# Altium PCB PCB1.PcbDoc (part 2 of 2)
Units mil, origin at the board's own origin, x right, y up, seen from the top; angles counter-clockwise.
Board outline 6000 x 4000 mil, 2 copper layers (Top Layer, Bottom Layer); 250 components, 133 nets, 708 pads, 265 vias.
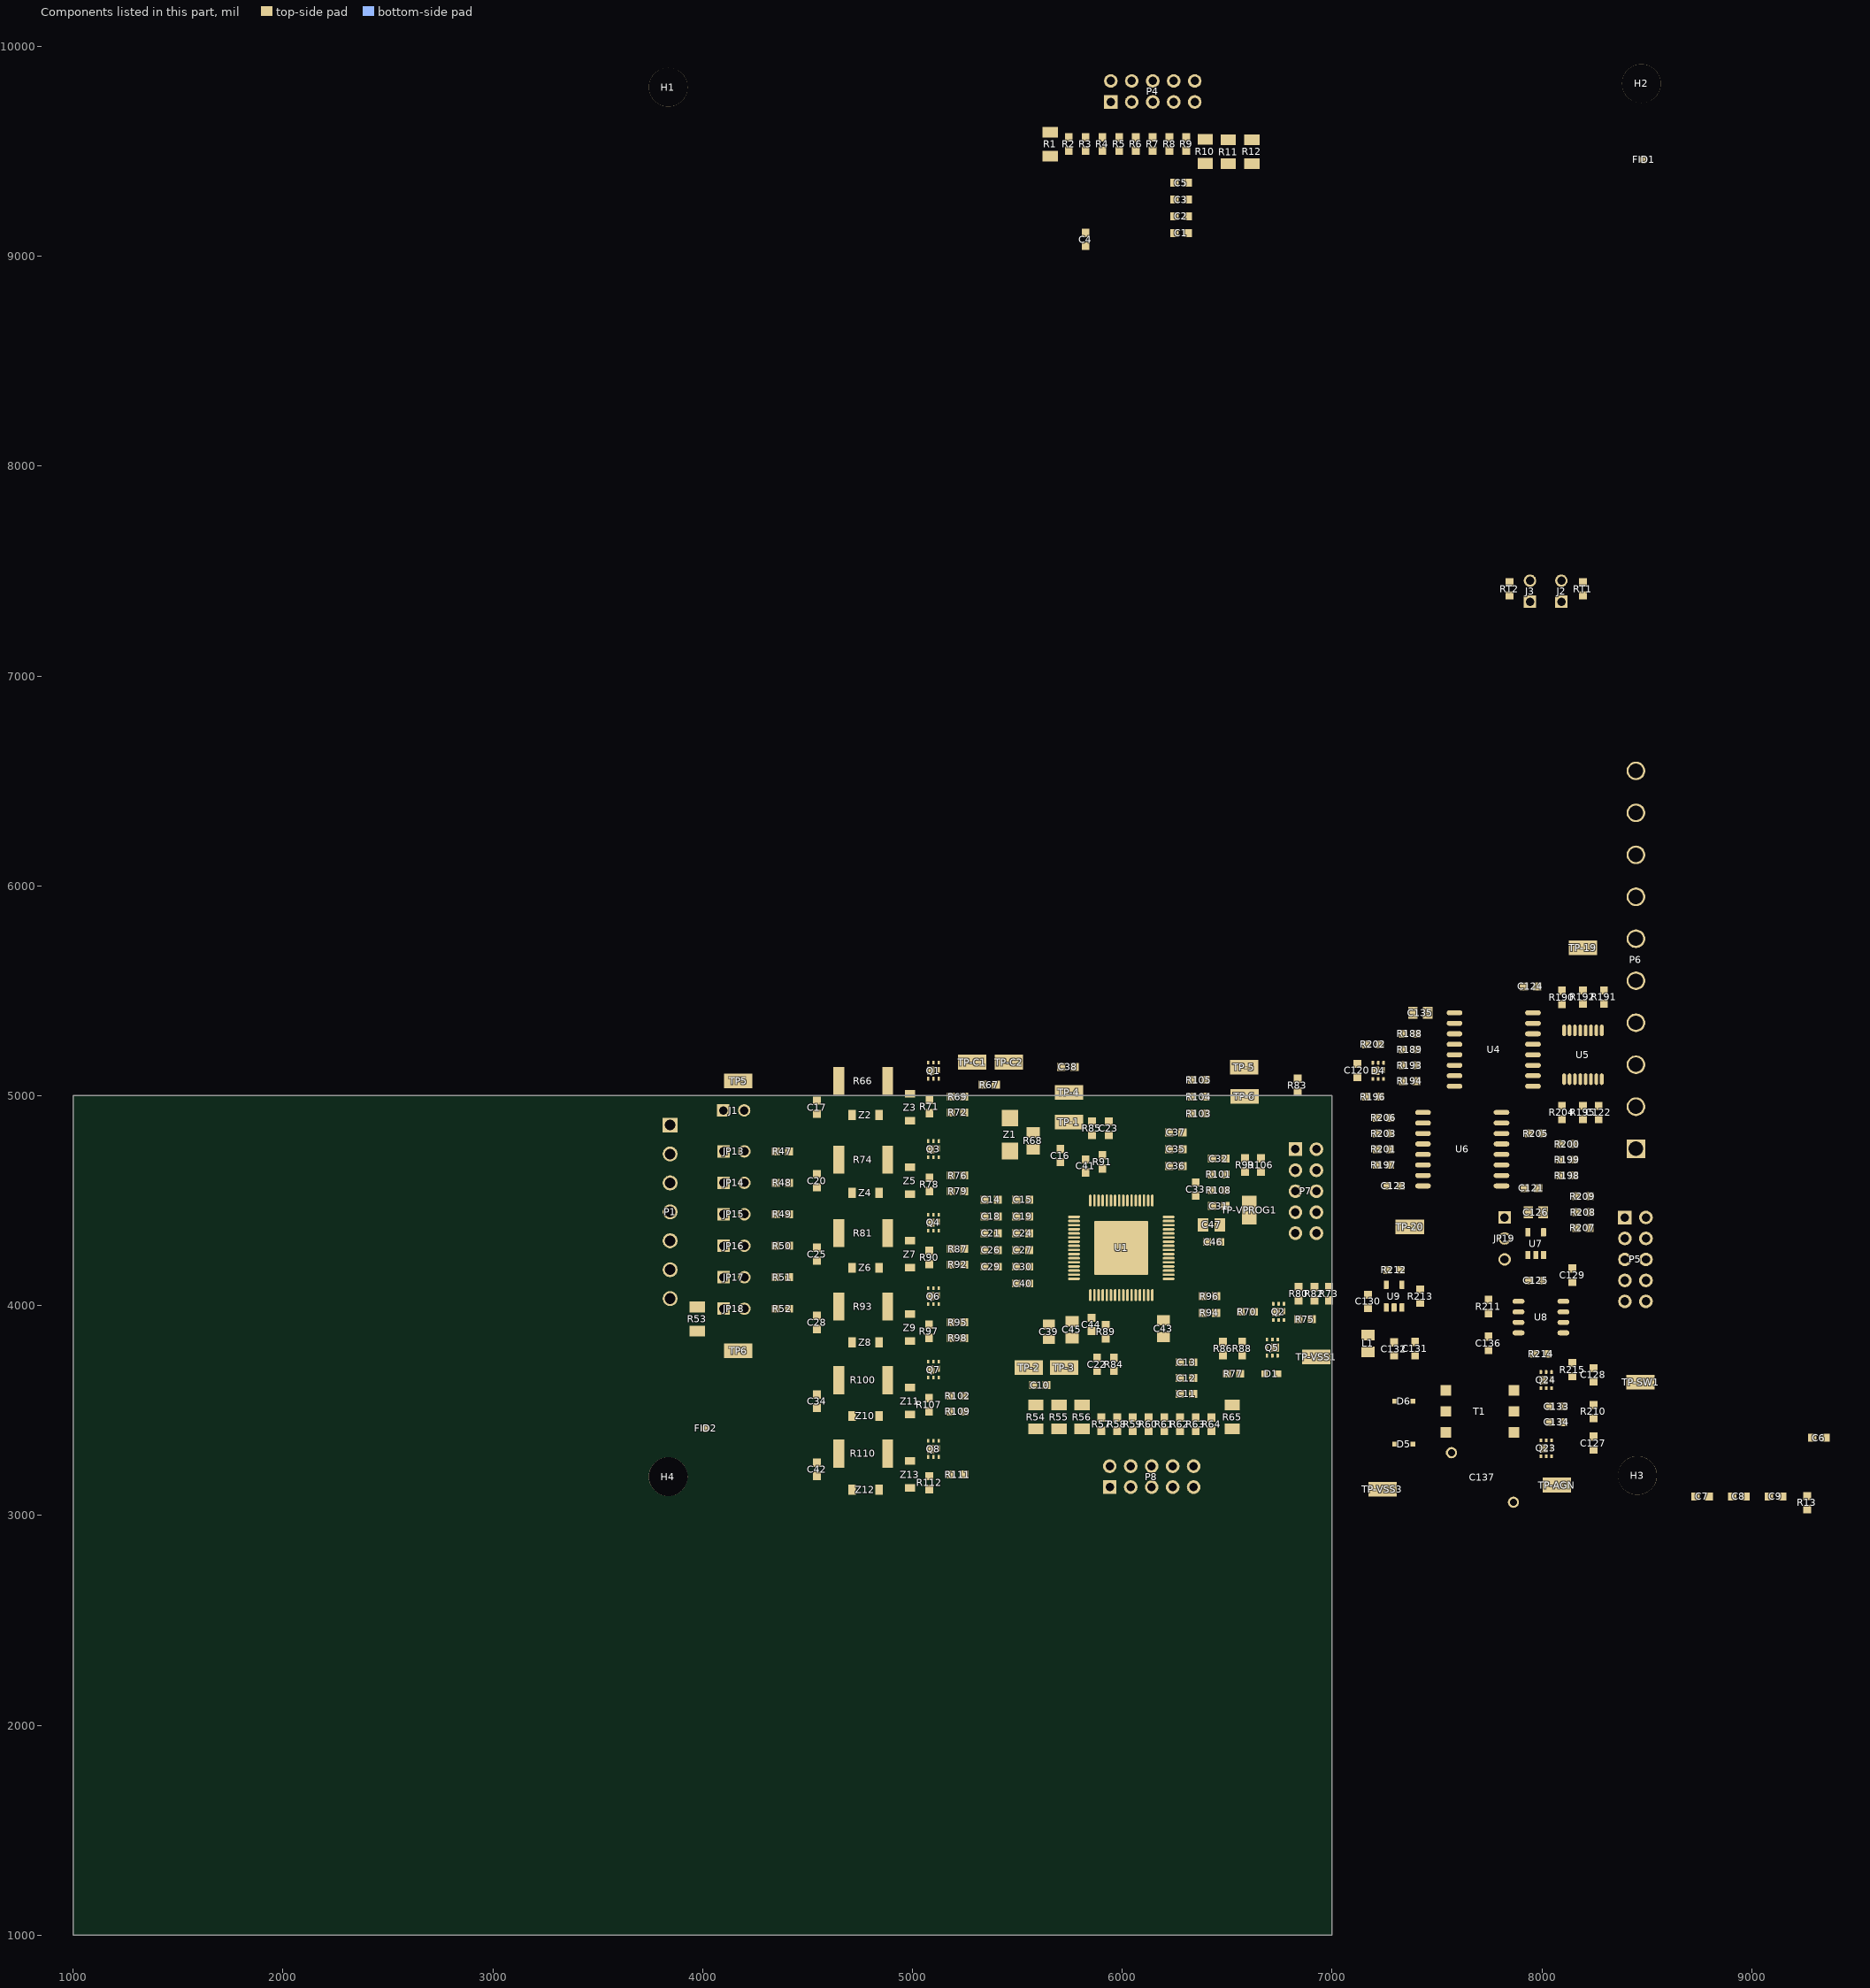
[diagram p2: the components of this part, seen from the top]

## Via types
v1: diameter 24, hole 12, Top Layer to Bottom Layer, tented both sides, 240 vias
v2: diameter 19.68, hole 7.87, Top Layer to Bottom Layer, 25 vias

## Nets (pads, with @x,y where several pads share a name; then routed paths per layer and width w, separated by ;. In a path a pad name is that pad's centre, name@x,y a point inside that pad or via, vN(x,y) a via of type N, cw(c..) or ccw(c..) an arc to the next point about the centre after c; other vN are vias at no path point) (continued)
copper on no net: | length 129699.8
  Top Layer w8: 5246.5,3195 5246.72,3195.22 v1(5317.75,3195.22) ; 5246.5,3495 5285,3495 5397.42,3607.42 5397.42,4027.82 5431.08,4061.48 5544.48,4061.48 5556.5,4073.5 5556.5,4105 5557.45,4105 5597,4144.55 5597,4185 ; 5246.5,3570 v1@5309.93,3570 ; 5246.5,3920 5247.33,3920.83 v1(5299.07,3920.83) ; 5246.5,4270 5251.96,4275.46 v1(5251.96,4333.97) ; 5246.5,4620 v1@5293.93,4620 ; 5246.5,4995 5248.53,4992.97 v1(5307.96,4992.97) ; 5250,3845 5318.26,3845 5353.43,3880.17 5353.43,4011.24 5278.31,4086.35 5278.31,4194.94 5308.2,4224.83 5452.29,4224.83 5583.06,4224.83 5597.12,4238.89 5597.12,4265.33 ; 5250,4195 5250,4201 5280,4231 5280,4279.94 5305.32,4305.26 5450.89,4305.26 5587.28,4305.26 5597.12,4315.1 5597.12,4344.35 ; 5250,4545 5250,4438.57 5291.13,4397.45 5303.17,4385.41 5586.44,4385.41 5598.53,4397.5 5598.53,4423.94 ; 5250,4920 5300.83,4920 5343.46,4877.36 5343.46,4585.46 5278,4519.99 5278,4491.01 5297.1,4471.89 5303.99,4465 5451,4465 ; 5410,4185 5451.73,4185 ; 5410,4265 5449.48,4265 ; 5410,4345 5449.76,4345 ; 5410,4425 5450.32,4425 ; 5449.48,4303.86 5449.48,4265 ; 5449.76,4384.29 5449.76,4345 ; 5450.32,4463.59 5450.32,4425 ; 5450.83,4570.17 5664.05,4570.17 5706,4528.22 5706,4446 5729.36,4422.64 5769.61,4422.64 ; 5451.45,4464.72 5587.28,4464.72 5594.59,4472.03 5594.59,4504.65 ; 5451.73,4224.27 5451.73,4185 ; 5490,4185 5451.73,4185 ; 5490,4265 5449.48,4265 ; 5490,4345 5449.76,4345 ; 5490,4425 5450.32,4425 ; v1(5535.07,3621.39) 5571,3621.39 5571,3621 ; 5555,3705 5587,3705 5637,3655 5670,3655 5706,3619 5893.48,3619 5925.7,3651.22 5925.7,3801.2 ; 5556.5,4185 5597,4185 ; 5560,4265.33 5597.12,4265.33 ; 5560,4344.35 5597.12,4344.35 ; 5560,4423.94 5598.53,4423.94 ; 5560,4504.65 5594.59,4504.65 ; v1(5586,3573) 5586,3529.57 5588,3527.57 ; 5588,3413.4 5588,3342 5695,3235 5940,3235 ; 5600,3706 5604,3706 ; v1@5624,4233 5643,4233 5655.47,4245.47 5769.61,4245.47 ; v1@5632,4303 5643,4303 5661.16,4284.84 5769.61,4284.84 ; v1@5633,4372.31 5681.1,4324.21 5769.61,4324.21 ; v1(5632.96,4441.97) 5711.42,4363.58 5769.61,4363.58 ; 5638.5,3621 5644,3621 5666,3599 5851,3599 5869,3581 5869,3530 5884,3515 5900,3515 ; v1@5667,4188 5681,4188 5699.1,4206.1 5769.61,4206.1 ; 5673.96,4265.33 5597.12,4265.33 ; 5674.13,4265.16 5766.65,4265.16 ; v1@5677.65,4510.22 5677.65,4448.35 5723.05,4402.95 5769.61,4402.95 ; 5698,3412.4 5700,3410.4 v1(5700,3357) ; 5698,3526.57 5700,3528.57 v1(5700,3573) ; 5711,4112 5726.36,4127.36 5769.61,4127.36 ; 5722,3705 5730,3705 5817,3792 5851,3792 5887,3828 5887,3900 5893.5,3906.5 5921,3906.5 5921,3936 5886.73,3970.27 5886.73,4049.61 ; 5745,5015 5842,5015 5900,4957 5900,4769 ; 5750,4880 5750,4920 5770,4940 v1(5800,4940) ; 5766.65,4343.9 5697.1,4343.9 5617.06,4423.94 5598.53,4423.94 ; 5766.65,4383.27 5719.73,4383.27 5661,4442 5661,4458.87 5615.22,4504.65 5594.59,4504.65 ; 5769.61,4147.05 5716.95,4147.05 v1(5711,4153) 5724.73,4166.73 5769.61,4166.73 ; 5769.61,4225.79 5659.95,4225.79 5619.17,4185 5597,4185 ; 5769.61,4304.53 5667.96,4304.53 5628.13,4344.35 5597.12,4344.35 ; 5775.67,5136.06 5775.67,5137.55 ; 5808,3412.4 5808,3353 5863,3298 5948,3298 5993,3253 5993,3182 6040,3135 ; 5808,3526.57 5809,3527.57 v1(5809,3573) ; v1@5847.36,3996.21 5847.36,4046.65 ; 5847.36,4503.35 5846.91,4503.8 v1(5846.91,4559.12) 5867.05,4538.98 5867.05,4503.35 ; 5855,4813.5 5855,4780.06 5866.06,4769 5900,4769 ; v1(5867,4102) v1(5867,4102) 5867.05,4049.61 ; 5878.4,4768.94 5878.4,4749.6 5868.25,4739.46 5868.25,4599.21 5906.42,4561.05 5906.42,4500.39 ; v1(5879.61,3649.07) 5879.61,3688.11 5880,3688.5 ; 5880,3755 5880,3787.92 5893.28,3801.2 5925.7,3801.2 ; v1(5899.61,3365.07) 5899.61,3401 ; 5900,3470 5900,3515 ; 5905,4653.5 5914,4644.5 v1(5914,4602) 5914,4576 5926.1,4563.9 5926.1,4500.39 ; 5905,4716.5 5900,4721.5 5900,4769 ; 5906.42,4049.61 5906.42,3981.58 5964,3924 5964,3886.5 5921,3843.5 ; 5915,5100 5915,5006.16 5968,4953.16 5968,4700.62 5945.79,4678.41 5945.79,4503.35 ; 5925.7,3840 5925.7,3801.2 ; 5926.1,4046.65 5926.1,3992.99 5999,3920.1 5999,3614 5950,3565 5920,3565 5900,3545 5900,3515 ; v1(5934,4916) 5934,4879.5 5936,4877.5 5935,4876.5 ; 5935,4813.5 5935,4780 5924,4769 5900,4769 ; 5945.79,4046.65 5945.79,4005.44 6019,3932.23 6019,3549 v1(5975,3505) 5975,3470 ; 5960,3688.5 5962,3686.5 v1(5962,3646) ; 5961.29,3755 5961.29,3792.72 5952.81,3801.2 5925.7,3801.2 ; 5965.47,4046.65 5965.47,4010.22 6050,3925.69 v1(6050,3505) 6050,3470 ; v1(5974.61,3365.07) 5974.61,3401 ; 5985.16,4046.65 5985.16,4015 6066.61,3933.55 6066.61,3563.39 v1(6125,3505) 6125,3470 ; 6024.53,4046.65 6024.53,4001.34 6095,3930.86 6095,3610 v1(6200,3505) ; 6024.53,4503.35 6024.53,4561.62 6058.13,4595.22 v1(6058.13,4920.03) 6058.13,5026.18 6045,5039.31 6045,5100 ; 6040,3235 6040,3245 5935,3350 5935,3492 5912,3515 5900,3515 ; 6044.21,4046.65 6044.21,4007.36 6115,3936.57 6115,3626.5 6236.5,3505 v1(6275,3505) 6275,3470 ; v1(6051.61,3364.07) 6051.61,3400 ; 6063.9,4046.65 6063.9,4012.37 6134.82,3941.45 6134.82,3689.02 6168.84,3655 ; 6063.9,4503.35 6063.9,4540.92 6119.12,4596.14 v1(6119.12,4997.02) 6119.12,5046.57 6120,5047.45 6120,5100 ; 6083.58,4046.65 6083.58,4015.36 6152,3946.94 6152,3762 6184,3730 6270,3730 6270,3702 6281.31,3690.69 6380.74,3690.69 6425.58,3645.85 6425.58,3575 6425,3574.42 v1(6425,3505) ; 6083.58,4503.35 6083.58,4536 6155.12,4607.54 6155.12,4961.02 6195,5000.91 6195,5100 6252.5,5100 6277.5,5075 6330,5075 ; 6122.95,4500.39 6122.95,4540.95 6133,4551 v1(6158,4551) 6142.64,4535.64 6142.64,4500.39 ; v1(6125.61,3364.07) 6125.61,3400 ; 6142.64,4049.61 6142.77,4049.47 v1@6142.77,4004.77 ; 6196,3930 6257.5,3930 6427.5,3760 6480,3760 ; v1(6199.61,3364.07) 6199.61,3400 ; 6200,3470 v1(6200,3505) ; v1(6214.42,4567.72) 6243.46,4567.72 6290,4614.26 6290,4665 6318.68,4665 6338.45,4684.78 6338.45,4744.78 6338,4745.23 ; v1(6219.05,3579.02) 6270,3579.02 6270,3580 ; 6220,4664.32 6220,4665 ; 6220,4744.78 6220,4745 ; 6220,4824.32 6220,4825 ; 6220.39,4127.36 v1@6269.64,4127.36 ; 6220.39,4147.05 6268.95,4147.05 6269.64,4146.36 ; 6220.39,4166.73 6259.27,4166.73 6271,4155 v1(6271,4126) ; 6220.39,4343.9 6180.9,4343.9 6159,4322 6159,4114 6193.29,4079.71 6435.29,4079.71 6446.5,4068.5 6446.5,4045 6446.5,3965 ; 6220.39,4363.58 6173.58,4363.58 6143,4333 6143,4104 6417,3830 6476.5,3830 6480,3826.5 6507.5,3826.5 6524,3810 6524,3773 6533.5,3763.5 6571,3763.5 ; 6220.39,4383.27 6261.11,4383.27 ; 6220.39,4402.95 6254.95,4402.95 6350,4498 ; 6220.39,4422.64 6251.04,4422.64 6308.85,4480.45 6308.85,4576.85 6322,4590 6350,4590 6350,4667.9 6382.1,4700 6391.06,4700 ; 6223.35,4186.42 6270.37,4186.42 6295.79,4161 6661,4161 6746.97,4246.97 6746.97,4377.55 6762.77,4393.35 6762.77,4645.7 6825,4707.93 6825,4745 6825,4883.75 6835,4893.75 6835,5015 6950,5015 7027.18,4937.82 7230.82,4937.82 7335,5042 7335,5070 ; 6223.35,4206.1 6277.42,4206.1 6306.53,4177 6652,4177 6730.97,4255.97 6730.97,4386.82 6742.1,4397.95 6742.1,5076.43 6834.02,5168.35 6956.66,5168.35 7130.01,4995 7160,4995 ; 6223.35,4225.79 6283.9,4225.79 6316.68,4193 6643,4193 6714.97,4264.97 6714.97,4398.6 6726.1,4409.73 6726.1,5083.02 6833.08,5190 7010,5190 7130,5310 7225.36,5310 7287.76,5247.6 7287.76,5244.24 7312,5220 7335,5220 ; 6223.35,4245.47 6289.95,4245.47 6326.42,4209 6634,4209 6698.2,4273.2 6698.2,4414.71 6710.1,4426.61 6710.1,5091.38 6838.72,5220 7015,5220 7125,5330 7328,5330 7335,5323 7335,5295 ; 6223.35,4265.16 6296.01,4265.16 6336.17,4225 6625,4225 6680,4280 6680,4440.69 v1(6681.44,4442.13) ; 6223.35,4284.84 6301.17,4284.84 6345.01,4241 6611,4241 6657.19,4287.19 6657.19,4466.41 6675.42,4484.64 v1(6675.42,4521.65) ; 6223.35,4304.53 6306.93,4304.53 6346.46,4265 v1(6555.15,4265) ; 6223.35,4324.21 6189.21,4324.21 6177,4312 6177,4122 6200.79,4098.21 6529.79,4098.21 6630,3998 6630,3970 ; 6240,3135 6190,3185 6190,3295 6162.42,3322.58 6162.42,3487.42 6180,3505 v1(6200,3505) ; 6240,3235 6285,3190 6357.93,3190 6460,3292.07 6460,3500 6455,3505 v1(6425,3505) ; 6270,3655 6168.84,3655 ; v1(6275.61,3364.07) 6275.61,3400 ; v1(6288.1,4997.02) 6330,4997.02 6330,4995 ; v1(6289.1,4917.03) 6330,4917.03 6330,4915 ; 6290,4745 6290,4745.23 6338,4745.23 ; 6290,4825 6321.41,4825 6338,4808.41 6338,4745.23 ; 6340,3135 6433,3135 6524,3226 6524,3414.91 ; 6340,3235 6340,3290.78 6315,3315.78 6315,3490 6330,3505 v1(6350,3505) ; v1(6349.61,3363.07) 6349.61,3399 ; 6350,3470 v1(6350,3505) ; 6350,4523.5 6350,4498 ; 6394.31,4625 6425,4625 ; v1(6424.61,3363.07) 6424.61,3399 ; 6425,3470 v1(6425,3505) ; 6425,4700 6391.06,4700 ; 6428.5,4475 6390,4475 ; 6428.5,4550 6399,4550 6390,4541 6390,4511 ; 6480,3763.5 6480,3760 ; 6498.5,3675 6498.5,3714.5 6480,3733 6480,3760 ; 6545,5000 6610,5000 6660,4950 6660,4705 ; 6545,5135 6545,5130 6492,5077 6492,4798 6574,4716 6585,4716 6585,4705 ; 6561.5,3675 6677.52,3675 ; 6571,3826.5 6571,3864 6594,3887 6672,3887 6689.41,3869.59 6689.41,3843.31 ; 6585,4635 6536.56,4586.56 6397.05,4586.56 6389.89,4593.72 6389.89,4698.83 6391.06,4700 ; 6660,4638.5 6660,4635 6536,4511 6390,4511 ; 6770.59,3926.69 6791.69,3926.69 6800,3935 6838.5,3935 6838.5,3907.5 6851,3895 6960,3895 6985,3920 6985,4025.5 ; 6825,4545 6875,4595 6954,4595 6977.47,4618.47 6977.47,4847.47 7025,4895 7210,4895 ; 6835,5085 v1(6835,5127.48) ; v1(6839.93,3981.71) 6839.93,4020 6840,4020 ; 6840,4090 6812,4090 6764.5,4137.5 6764.5,4371.02 6786.15,4392.67 6786.15,4406.15 6825,4445 6875,4495 6950,4495 6994.97,4539.97 6994.97,4799.97 7015,4820 7210,4820 ; 6910,4090 6915,4095 6915,4150.03 6780.5,4284.53 6780.5,4363.43 6812.07,4395 6845.15,4395 6863.83,4413.68 6893.68,4413.68 6925,4445 7015,4535 7015,4725 7035,4745 7210,4745 ; v1(6914.93,3981.71) 6914.93,4020 6915,4020 ; 6980,4090 6980,4190 6825,4345 6875,4395 6963,4395 7031,4463 7031,4660 7041,4670 7210,4670 ; 7230,4995 7230,5031.16 7245.59,5046.75 7245.59,5076.69 ; 7845,7383.5 7845,7335 7868,7312 7901,7312 7943,7354 ; 7845,7435 7845,7449 7885,7489 7916,7489 7945,7460 ; 8092,7354 8132,7314 8178,7314 8195,7331 8195,7383.5 ; 8094.15,7460.85 8122.31,7489 8159,7489 8195,7453.01 8195,7435 ; 6168.84,3655 6168.84,3595.29 6220.13,3544 6311,3544 v1(6350,3505) ; 6350,4498 6373,4475 6390,4475 ; 6390,4475 6390,4511
  Top Layer w10: 5855,4876.5 v1(5855.03,4921.43) ; 6004.84,4049.61 6004.84,4103.84 v1(6005,4104) ; 7392.5,3340 7448.5,3396 7541.4,3396 ; 7392.5,3545 7443.5,3596 7541.4,3596 ; 7745,3963.5 7745,3851.5 7803.5,3851.5 7822,3870 7900,3870 ; 7900,3920 7929,3920 7963.5,3885.5 7963.5,3770 ; 8095,5437.5 8132.5,5437.5 8155,5415 8155,5302.3 ; 8195,4951.5 8195,5001 8220,5026 8248,5026 8257.3,5035.3 8257.3,5083.3
  Top Layer w12: 5400.02,5051.45 5400.02,4659.98 5450,4610 5450,4505 ; 5406.5,4505 5450,4505 ; 5470,5175 5575,5070 5575,4820 ; 5493.5,4505 5450,4505 ; 5630,5137.55 5705.67,5137.55 ; 5630,5212.93 5630,4727.34 5653.94,4703.4 5653.94,4606.69 ; 5650,3910.43 5650,4051 5711,4112 ; 6385,4385 6385,4397.23 6422.77,4435 6555,4435 6605,4485 ; v1(6523,3573) 6524,3572 6524,3526.57 ; 7215,4170 7260,4170 ; v1(7359.8,4620.2) 7359.9,4620.1 7430.4,4620.1 ; v1(7359.8,4920.2) 7359.9,4920.1 7430.4,4920.1 ; v1(7360,4870) 7360.1,4870.1 7430.4,4870.1 ; 7405,5070 7450.1,5070 7465.1,5085 7465.1,5120 7490,5144.9 7580.6,5144.9 ; 7405,5145 7435.1,5145 7485,5194.9 7580.6,5194.9 ; 7405,5220 7460.1,5220 7485,5244.9 7580.6,5244.9 ; 7405,5295 7405.1,5294.9 7580.6,5294.9 ; v1(7410,5340) 7441,5340 7455.43,5354.43 7455.43,5395 v1(7505,5395) 7505.1,5394.9 7580.6,5394.9 ; v1(7510,5045) 7510.1,5044.9 7580.6,5044.9 ; v1(7510,5095) 7510.1,5094.9 7580.6,5094.9 ; 7807.01,4820 7938.5,4820 ; 7809.4,4570.1 7874.9,4570.1 v1(7875,4570) 7915,4570 7915,4560 ; 7809.4,4620.1 7874.9,4620.1 v1(7875,4620) ; 7809.4,4670.1 7809.5,4670 7970,4670 8020,4620 8085,4620 8085,4585 8070,4570 8070,4425 8085,4410 8190,4410 8230,4370 8230,4105 8315,4020 8395,4020 ; 7809.4,4720.1 7809.5,4720 7980,4720 8015,4685 8040,4685 ; 7809.4,4770.1 7809.5,4770 7950,4770 7960,4760 8040,4760 ; 7809.4,4870.1 7879.9,4870.1 v1(7880,4870) ; 7809.4,4920.1 7879.9,4920.1 v1(7880,4920) ; 7959.6,5144.9 8040,5144.9 8059.9,5125 8059.9,5025 8060,5024.9 8060,5020 v1(8063,5019) ; 7959.6,5194.9 7959.7,5195 8035,5195 v1@8050.9,5179.1 ; 7959.6,5244.9 7959.7,5245 v1@8028.75,5245 ; 7959.6,5294.9 7959.6,5294.96 v1(8039.09,5294.96) 8099.05,5235 8159.9,5235 8179.9,5215 8179.9,5083.9 8180.5,5083.3 ; 7970,4250 7970,4210 7980,4200 v1(8005,4200) 8007,4202 8007,4250 ; 8005,4820 v1(8055,4820) 8077.62,4820 8089.62,4808 8193.77,4808 8315,4686.77 8315,4300 8395,4220 ; v1(8014.02,3970.07) 8089,3970.07 8089,3970 ; v1(8025.63,3920.58) 8089,3920.58 8089,3920 ; v1(8030.79,5242.96) v1@8028.75,5245 ; 8045.59,3276.69 8045.59,3275.93 v1(8093.21,3275.93) ; 8045.59,3601.69 8045.59,3603.93 v1(8073.21,3603.93) ; v1(8050.9,5178.59) v1@8050.9,5179.1 ; v1(8080,3690) 8080,3718.29 8071.44,3726.85 8036.6,3726.85 8030,3733.45 8030,3770 8065,3770 8105,3730 8145,3730 ; 8085,4695 8050,4695 8040,4685 ; 8085,4770 8050,4770 8040,4760 ; 8095,4955 8060,4990 8060,5019 v1(8063,5019) ; 8103.7,5083.3 8103.7,5030 8093.7,5020 8063,5020 v1(8063,5019) ; 8103.8,5302.3 8103.8,5360 v1@8116.9,5373.1 ; v1(8115,5375) v1@8116.9,5373.1 ; 8129.3,5083.3 8129.3,5140 8109.3,5160 8070,5160 v1@8050.9,5179.1 ; 8129.4,5302.3 8129.4,5360.6 v1@8116.9,5373.1 ; 8154.9,5083.3 8154.9,5180 8134.9,5200 8075,5200 8030,5245 v1@8028.75,5245 ; 8155,4620 v1(8195,4620) ; 8155,4695 v1(8195,4695) ; 8155,4770 v1(8195,4770) ; 8180.6,5302.3 8180.6,5375 8185,5379.4 8204.4,5379.4 v1(8205,5380) ; 8195,4885 8195,4855 8210,4840 8225,4840 8235,4850 8235,4990 8250,5005 v1(8285,5005) ; 8195,5438.5 8257.4,5376.1 8257.4,5302.3 8257.4,5182.86 8335,5105.26 8335,4380 8395,4320 ; 8206.1,5083.3 8206.1,5146.1 v1(8215,5155) 8230,5140 8231.7,5140 8231.7,5083.3 ; 8206.2,5302.3 8206.2,5378.8 v1(8205,5380) ; 8231.8,5302.3 8231.8,5373.2 8225,5380 v1(8205,5380) ; 8270,4955 8285,4970 v1(8285,5005) ; 8283,5083.3 8283,5007 v1(8285,5005) ; 8295,5438.5 8295,5375 8283,5363 8283,5302.3 8283,5200.04 8355.5,5127.54 8355.5,4680 8395,4640.5 8395,4420 ; 8395,4120 8292.48,4222.52 8292.48,4482.52 8255,4520 8230,4520 8230,4560.86 8250,4580.86 8250,4676.77 8194.27,4732.5 8067.5,4732.5 8040,4760 ; 8495,4120 8448.5,4073.5 8333.89,4073.5 8270,4137.39 8270,4430 8255,4445 8230,4445 8230,4475 8222.5,4482.5 8112.5,4482.5 8094,4501 8094,4545 8119,4570 8181.77,4570 8221,4609.23 8221,4630.77 8194.27,4657.5 8067.5,4657.5 8040,4685
  Top Layer w15: v1(6288.85,4053.21) 6288.85,4016.75 6340.6,3965 6383.5,3965 6383.5,3924.58 6411.62,3896.46 6489.96,3896.46 6563.5,3970 ; v1(7215,4240) 7215,4170 7215,4144 7258,4101 7258,4087
  Top Layer w16: 6261.11,4383.27 6281.56,4383.27 v1(6282,4383) 6281.56,4383.32 6281.56,4383.46 v1@6315.48,4383.46 ; v1@6321,4379.02 6316.02,4384 v1(6322,4384)
  Top Layer w20: v1(5303,4345) 5345.5,4345 ; v1(5303,4424) 5345.5,4424 ; v1(5303,4505) 5345.5,4505 ; v1(5304,4186) 5346.5,4186 ; v1(5304,4264) 5346.5,4264 ; v1(5444.52,4025) 5490.5,4025 ; v1(5447.52,4105) 5493.5,4105 ; 5465,4893.74 v1(5465,4959) v1(5465,4991) ; 5648,3837.57 5650,3839.57 ; 5705,4746.5 v1(5705,4792) ; 5825,4699.43 v1(5825,4752) ; v1(5853,3830) 5853,3878.5 ; v1@6142.77,4004.77 v1(6142.77,3994.51) 6177.49,3994.51 6196,3976 6196,3930 ; v1(6342,4044) 6382.5,4044 6383.5,4045 ; 6466.5,4303 6468.5,4305 v1(6515,4305) ; 6901.5,3935 v1(6954,3935) ; 7120,5151.5 v1(7120,5197) ; 7163.5,5245 7166,5247.5 v1(7166,5286) ; 7170,3860 7177,3860 7219.5,3902.5 ; 7171,3988.5 7171,3951 7219.5,3902.5 ; 7171,4051.5 7172,4052.5 v1(7172,4103) ; v1(7215,4570) 7263.5,4570 ; 7257.6,3990.87 7257.6,3940.6 7219.5,3902.5 ; 7276.5,4670 7432.99,4670 ; 7276.5,4745 7281,4745 7306,4720 7432.99,4720 ; 7276.5,4820 7287,4820 7337,4770 7432.99,4770 ; 7276.5,4895 7281,4895 7356,4820 7432.99,4820 ; 7295,3825.5 7296,3826.5 v1(7296,3881) ; 7326.5,4170 7396,4170 7420,4146 7420,4076.5 ; 7326.5,4570 v1(7367,4570) ; 7332,4170 7332,4099.54 7332.4,4099.13 ; 7370,4375 7367,4378 v1(7367,4570) ; 7395,3826.5 7396,3827.5 v1(7396,3881) ; 7420,4013.5 7421,4012.5 v1(7421,3960) ; 7432.99,4570 v1(7367,4570) ; v1(7742,3738) 7742,3785.5 7745,3788.5 ; 7822,4420 7876,4420 ; v1(7864,5521) 7913.5,5521 ; v1(7889,4117) 7936.5,4117 7938.5,4119 ; 7932.6,4349.13 7895.87,4349.13 7876,4369 7876,4420 ; 7934.57,4445 7909.57,4420 7876,4420 ; 7981.5,4560 v1(8032,4560) ; 8005.43,4445 8006,4445.57 v1(8006,4496) ; 8095,4888.5 8099,4884.5 v1(8099,4837) ; 8101.5,3445 v1(8146,3445) ; 8101.5,3520 v1(8149,3520) ; v1(8119,4443) 8162.5,4443 8164.5,4445 ; v1(8120,4368) 8161.5,4368 8163.5,4370 ; v1(8120,4519) 8161.5,4519 8163.5,4521 ; 8145,3663.5 8146,3662.5 v1(8146,3618) ; 8145,4176.5 v1(8145,4227) ; 8245,3313.5 8246,3312.5 v1(8246,3260) ; 8245,3701.5 8247,3703.5 v1(8247,3747) ; 8270,4888.5 8272,4886.5 v1(8272,4834)
  Top Layer w24: 4098,4930 4098,4938 4170,5010 4170,5070 ; 4100,4930 4230.48,4799.52 4395,4799.52 4413.09,4781.43 4413.09,4735 4415,4735 ; 4101,4135 4101,4089 4120.34,4069.66 4450.63,4069.66 4471.99,4048.3 4471.99,4009.97 4446.51,3984.49 4446,3985 4415,3985 ; 4101,4285 4101,4239 4120.34,4219.66 4450.63,4219.66 4471.99,4198.3 4471.99,4159.97 4446.51,4134.49 4446,4135 4415,4135 ; 4101,4435 4101,4389 4120.34,4369.66 4450.63,4369.66 4471.99,4348.3 4471.99,4309.97 4446.51,4284.49 4446,4285 4415,4285 ; 4101,4585 4101,4539 4120.34,4519.66 4450.63,4519.66 4471.99,4498.3 4471.99,4459.97 4446.51,4434.49 4446,4435 4415,4435 ; 4101,4735 4101,4689 4120.34,4669.66 4450.63,4669.66 4471.99,4648.3 4471.99,4609.97 4446.51,4584.49 4446,4585 4415,4585 ; 4201,3985 4345,3985 ; 4201,4135 4345,4135 ; 4201,4285 4345,4285 ; 4201,4435 4345,4435 ; 4201,4585 4345,4585 ; 4201,4735 4345,4735 ; 4640,3295 4640,3205 4665,3180 4891.45,3180 4904.94,3166.51 4904.94,3137.51 4885.14,3117.71 4834.5,3117.71 4834.5,3120 ; 4640,3645 4640,3550 4655,3535 4886.45,3535 4901.21,3520.24 4901.21,3480.78 4890.43,3470 4834.5,3470 ; 4640,3995 4640,3900 4655,3885 4886.45,3885 4899.55,3871.9 4899.55,3836.55 4883,3820 4834.5,3820 ; 4640,4345 4640,4250 4655,4235 4886.45,4235 4903.28,4218.17 4903.28,4190.28 4883,4170 4834.5,4170 ; 4640,4695 4640,4605 4650,4595 4876.45,4595 4896.65,4574.8 4896.65,4550.16 4876.35,4529.86 4844.36,4529.86 ; 4640,5070 4640,4989 4667.75,4961.25 4867.57,4961.25 4893.03,4935.78 4893.03,4916.31 4881.02,4904.3 4843.8,4904.3 ; 5465,4745.5 5465,4687.33 5481.19,4671.14 5575,4671.14 ; 5575,4750 5575,4671.14 ; 5705,4680 5705,4606.69 ; 5760,3845 5760.21,3845 v1(5760.21,3785.72) ; 5760,3925 5760,3987.77 5768.44,3996.21 5847.36,3996.21 v1(5850.7,3996.21) 5850.7,3945 5850,3945 ; 5825,4630 5825,4580.32 ; v1(5846.91,4559.12) 5846.55,4558.77 5825,4580.32 ; 5854,4873 5855.03,4873 ; 5935,4872 5936.03,4872 ; v1(6197,3759) v1(6197,3802) 6197,3853 ; v1@6321,4379.02 6321,4327.22 6353.22,4295 6400,4295 ; v1(6322,4384) 6323,4385 6385,4385 ; 6331.31,3580.97 v1(6379.74,3580.97) ; 6332.31,3654.97 v1(6380.74,3654.97) ; 6333.31,3731.97 v1(6381.74,3731.97) ; 6403,5076 6403,5074.97 v1(6451.43,5074.97) ; 6404,4918.2 6404,4917.17 v1(6452.43,4917.17) ; 6405,4995 6405,4993.97 v1(6453.43,4993.97) ; 6465,4385 6465,4384.76 v1(6511.76,4384.76) v1@6511.76,4385.04 ; 6487,4552 6487,4550.97 6496.03,4560 v1(6540,4560) ; 6487,4627 6487,4625.97 v1(6535.43,4625.97) ; 6488,4477 6488,4475.97 v1(6536.43,4475.97) ; 6489,4702 6489,4700.97 v1(6537.43,4700.97) ; 7170,3775 7170,3720 7180,3710 7295,3710 ; v1(7235,3340) 7287.5,3340 ; v1(7240,3545) 7287.5,3545 ; 7295,3760 7295,3710 ; 7295,4000 7295,3955 v1(7315,3935) 7330,3950 7332,3950 7332,4000 ; v1(7330,5395) 7380,5395 ; 7395,3760 7395,3710 ; v1(7505,5345) 7505.1,5344.9 7580.6,5344.9 ; 7541.4,3496 7611,3496 7640,3525 7640,3660 7590,3710 7395,3710 ; v1(7584.3,3114.12) 7628.5,3114.12 7628.5,3174.39 7585.07,3174.39 v1(7585.07,3174.64) ; 7745,4030 7745,4233.28 7781.72,4270 7871.39,4270 7891.39,4250 7933,4250 7933,4210.23 7977.67,4165.56 8061.51,4165.56 8077.5,4149.57 8077.5,4110 8145,4110 8145,4020 ; 7820,4220 7820,4095 7840,4075 v1(8005,4075) 8005,4120 ; v1(7834.05,3969.87) 7834.05,3970 7900,3970 ; v1@7858.57,3113.35 v1(7858.57,3112.59) 7810.41,3112.59 7809.5,3113.5 7809.5,3174.6 7859.33,3174.6 v1(7859.33,3173.87) 7916.13,3173.87 7945,3145 8070,3145 ; 7959.6,5044.9 8031,5044.9 v1(8031,5044) ; 7959.6,5094.9 8030,5094.9 v1(8030,5096) ; 7959.6,5344.9 8034.9,5344.9 v1(8035,5345) ; 7959.6,5394.9 7959.6,5454.6 v1(7960,5455) 7960,5455.36 7980,5475.36 7980,5520 ; 7976.5,5521 8014,5521 8034.5,5500.5 8095,5500.5 ; 8035,3520 8035,3445 8082.78,3397.22 8164.8,3397.22 8182.02,3380 8245,3380 8245,3460 8209,3460 8190,3479 8190,3580 8245,3635 8320,3635 ; 8089,3870 8161.18,3870 v1(8161.18,3867.98) ; 8089,4020 8145,4020 ; 8095,5505 8095,5640 8125,5670 8190.55,5670 8192.47,5668.08 ; 8195,5501.5 8195,5665.55 8192.47,5668.08 ; v1(8245,3580) 8245,3530 8328.63,3530 8343.63,3545 8530,3545 8570.04,3585.04 8570.04,4220 ; 8295,5505 8295,5636.09 8227.74,5703.35 8192.47,5668.08 ; 8470,3635 8320,3635 ; 8495,4220 8570.04,4220 ; 8495,4320 8557,4320 8570.27,4306.73 8570.27,4220 8570.04,4220 ; 5575,4671.14 5575,4648.87 5617.18,4606.69 5653.94,4606.69 5705,4606.69 ; 5705,4606.69 5734,4606.69 5767.69,4573 5825,4573 5825,4580.32 ; 7295,3710 7395,3710 ; 8145,4020 8320,3845 8320,3635
  Top Layer w25: 4200,4930 4525,5255 5340,5255 5420,5175 5470,5175 ; 4640,5070 4640,5151.5 4703.5,5215 5205,5215 5260,5160 5262,5160 5333.52,5088.48 5333.52,5051.75
  Top Layer w30: 7866.6,3496 7922,3496 7973,3445 8035,3445
  Top Layer w40: 3845,4860 3850,4865 3850,5243.5
  Top Layer w48: 3845,4033.23 3895.23,3983 4101,3983 4101,3891.75 4095,3885.75 4095,3785
  Bottom Layer w8: v1@5251.55,4334.16 5289.36,4371.97 v1(5631.96,4371.97) ; v1@5294.41,4619.83 5455.1,4619.83 v1(5632.96,4441.97) ; v1(5299.07,3920.83) 5324.49,3946.25 5324.49,4015.91 5516.81,4208.24 5534.08,4208.24 v1@5627.46,4301.62 ; v1@5308.97,4993.87 5338.86,4963.98 5338.86,4849.07 v1(5675.96,4511.97) ; v1@5309.9,3570 5366,3626.1 5366,3901.02 5627.96,4162.98 v1(5627.96,4232.97) ; v1(5317.75,3195.22) 5444.55,3322.01 5444.55,3892.05 5646.53,4094.03 5646.53,4166.96 v1@5665.61,4186.04 ; v1(5700,3357) 5700,3228 5793,3135 5940,3135 ; v1(5800,4940) 5800,4905 5831,4874 5884,4874 5937,4821 5937,4625 v1(5914,4602) ; v1(5846.91,4559.12) 5992.11,4559.12 6007.99,4575 6182,4575 6189.28,4567.72 v1(6214.42,4567.72) ; v1@5854.8,4918.12 5878.8,4942.12 5973.52,4942.12 6024.64,4891 6517.79,4891 7945,6318.21 7945,7360 ; v1(5879.61,3649.07) 5879.61,3901.67 5972.45,3994.51 v1(6142.77,3994.51) 6340.51,3994.51 6404,4058 6404,4753.81 6399.53,4758.28 6399.53,4851.04 ; v1(5934,4916) 5998.96,4851.04 6399.53,4851.04 ; v1@5959.4,3648.42 6128.42,3648.42 6451,3971 6451,4778.19 8095,6422.19 8095,7360 ; v1(6058.13,4920.03) 6127.08,4920.03 6132.11,4915 6215.01,4915 6217.04,4917.03 v1(6289.1,4917.03) ; v1(6119.12,4997.02) 6141.58,4997.02 6148.6,4990 6215.01,4990 6222.03,4997.02 v1(6288.1,4997.02) ; v1(6555.15,4265) 6595,4265 6655.97,4325.97 6655.97,4450.6 6694.87,4489.5 6880.5,4489.5 6925,4445 ; v1(6675.42,4521.65) 6728.29,4521.65 6751.64,4545 6825,4545 ; v1(6681.44,4442.13) 6728.29,4442.13 6731.16,4445 6825,4445 ; 7945,7460 8004.43,7460 8022.62,7438.77 ; 8095,7460 8043.85,7460 8022.62,7438.77 ; 6399.53,4851.04 6500.46,4851.04 8022.62,6373.2 8022.62,7438.77
  Bottom Layer w12: v1(5586,3573) 5586,3577 5624,3615 5713,3615 5752,3576 5752,3514 5801,3465 5958,3465 5975,3482 v1(5975,3505) ; v1(5700,3573) 5700,3502 5777,3425 5970,3425 v1(6050,3505) ; v1(5809,3573) 5809,3574 5843,3608 6022,3608 v1(6125,3505) ; v1(6200,3505) 6219.05,3524.05 v1(6219.05,3579.02) ; v1(6275,3505) 6305,3535 6485,3535 v1(6523,3573) ; v1(7165,5095) v1(7410,5340) ; v1(8014.02,3970.07) 8180,3804.09 8180,3362.71 v1(8093.21,3275.93) ; v1(8025.63,3920.58) 8155.48,3790.73 8155.48,3686.19 v1(8073.21,3603.93) ; v1(8030.79,5242.96) 8225.43,5242.96 8323.38,5145 8445,5145 ; v1(8039.09,5294.96) 7977,5294.96 7955,5272.96 7955,5094 7979,5070 8320,5070 8445,4945 ; v1(8050.9,5178.59) 8004.79,5224.7 8004.79,5253.72 8020.02,5268.96 8179.41,5268.96 8255.45,5345 8445,5345 ; v1(8063,5019) 8216,4866 8480,4866 8515,4901 8515,5409 8445,5479 8445,5545 ; v1(8080,3360) 8021,3419 8021,3631 v1(8080,3690) ; 8395,4020 8441.5,3973.5 8514.26,3973.5 8581.5,4040.74 8581.5,6208.5 8445,6345 ; 8395,4120 8348.5,4073.5 8348.5,4000.74 8395.74,3953.5 8522.55,3953.5 8601.5,4032.45 8601.5,6388.5 8445,6545 ; 8395,4220 8445,4170 8445,4104.24 8475.74,4073.5 8514.26,4073.5 8561.5,4120.74 8561.5,6028.5 8445,6145 ; 8445,5945 8445,5860.25 8541.5,5763.75 8541.5,4166.5 8495,4120
  Bottom Layer w24: v1(5867,4102) 5867,4092.03 5905.82,4053.21 v1(6288.85,4053.21) 6322,4086.36 v1(6322,4384) ; v1(8005,4075) 8210,3870 8210,3615 v1(8245,3580)
  Bottom Layer w48: 3845,4171.02 3958.89,4171.02 3994.91,4135 4101,4135 4176,4060 4213.68,4060 4305,3968.68 4305,3603.43 4493.43,3415 v1(4550,3415) v1(4595,3415) v1(4640,3415) ; 3845,4308.82 3958.89,4308.82 3982.71,4285 4101,4285 4176,4210 4213.68,4210 4410,4013.68 4410,3843.43 4488.43,3765 v1(4545,3765) v1(4595,3765) v1(4645,3765) ; 3845,4446.61 3958.89,4446.61 3970.5,4435 4101,4435 4176,4360 4292.44,4360 4542.44,4110 v1(4565,4110) v1(4620,4110) v1(4665,4110) ; 3845,4584.41 3976.6,4584.41 3977.19,4585 4101,4585 4166,4650 4415,4650 4528,4537 4528,4482.19 4550.19,4460 v1(4565,4460) v1(4615,4460) v1(4665,4460) ; 3845,4722.2 3976.6,4722.2 3989.4,4735 4101,4735 4163,4797 4285.34,4797 4313.34,4825 v1(4575,4825) v1(4630,4825) v1(4680,4825) ; 3845,4860 4030,4860 4230,5060 v1(4525,5060) v1(4565,5060) ; 4101,3985 4101,3899.32 4215,3785.32 4215,3310 4430,3095 v1(4584,3095) v1(4625,3095) ; v1(5130,4516) 5130,4636 5170,4676 5170,4748.17 v1(5169.74,4748.17) 5170,4751 v1(5170,4791) ; v1(5130.15,3815.54) 5130,3819 5130,3982 5165,4017 5165,4048.48 v1(5164.89,4048.48) 5165,4051 v1(5165,4091) ; v1(5130.26,4880.34) 5130,4885 5130,5031 5170,5071 v1(5170,5163) ; v1(5135,3084) 5135,3214 5160,3239 v1(5160,3368) ; v1(5135,3465) 5135,3588 5165,3618 5165,3697.84 v1(5165.82,3697.84) 5165,3701 v1(5165,3741) ; v1(5135,4172) 5135,4293 5165,4323 v1(5165,4444)
  other v1: 4045,3095 4245,3095 5495,3095 5695,3095 6545,3095 6745,3095 6945,3095 4541,3096 5134.84,3127.25 6995,3245 5160.19,3324.82 5295,3345 3745,3445 6995,3445 5135.24,3512.34 5309.96,3569.97 3745,3645 5295,3695 6655,3775 3956,3786 3996,3786 5647.52,3788 3955,3827 3996,3827 3745,3845 5129,3859 5295,3995 3745,4045 6785,4045 5665.96,4185.97 5134.5,4214.45 3745,4245 5629.96,4301.97 5165.15,4400.14 3745,4445 5129.41,4559.58 5293.96,4619.97 3745,4645 5295,4795 3745,4845 5131,4926 5362,4991 4545,5025 3745,5045 6925.82,5106.15 5169.45,5119.9
  other v2: 5892.64,4172.64 5943.82,4172.64 5995,4172.64 6046.18,4172.64 6097.36,4172.64 5892.64,4223.82 5943.82,4223.82 5995,4223.82 6046.18,4223.82 6097.36,4223.82 5892.64,4275 5943.82,4275 5995,4275 6046.18,4275 6097.36,4275 5892.64,4326.18 5943.82,4326.18 5995,4326.18 6046.18,4326.18 6097.36,4326.18 5892.64,4377.36 5943.82,4377.36 5995,4377.36 6046.18,4377.36 6097.36,4377.36

## Other copper
Top Layer:
  region: 4355,5265 4328.81,5238.81 4426.19,5238.81 4400,5265
  region: 5798.15,4190.35 5798.13,4190.37 5732.43,4190.37 5703.09,4161.03 5703.09,4143.01 5797.46,4143.01 5798.15,4142.32
  region: 6750,4030 6685,4030 6645,3990 6615,3990 6615,3950 6645,3950 6685,3910 6750,3910 6750,4030
  region: 7842,3421 7842,3325 7910,3325 7975,3260 8025,3260 8025,3333 8025,3375 7983,3375 7937,3421
  region: 4510,4229 4510,3935 4680,3935 4680,4065 4625,4065 4625,4080 4985,4080 5065,4160 5202.98,4160 5202.98,4225 4985,4225 4890,4130 4730,4130 4730,4205 4590,4205 4566,4229
  region: 4508.3,3530 4508.3,3240 4675,3240 4675,3365 4635,3365 4635,3380 4980,3380 5050,3450 5202.98,3450 5202.98,3520 4980,3520 4885,3425 4745,3425 4745,3500 4605,3500 4575,3530
  region: 4508.3,3200 4508.3,3050 5205,3050 5205,3148 4964,3148 4901,3085 4792,3085 4729,3148 4642,3148 4590,3200
  region: 5115,4800 5190,4800 5190,4734 5115,4734
  region: 4964,4590 5202.98,4590 5202.98,4715 5130,4715 5115,4700 5115,4680 5105,4670 5035,4670 5025,4680 4964,4680
  region: 8025,3590 7910,3590 7891,3571 7841,3571 7841,3620 7921,3700 8025,3700
  region: 4510,4580 4510,4261 4675,4261 4675,4415 4630,4415 4630,4430 4950,4430 5025,4505 5202.08,4505 5202.08,4565 4970,4565 4885,4480 4730,4480 4730,4565 4590,4565 4575,4580
  region: 6695,3745 6630,3745 6630,3810 6695,3810 6695,3745
  region: 4508.3,3905 4508.3,3562 4680,3562 4680,3715 4625,3715 4625,3730 4980,3730 5055.25,3805.25 5203.43,3805.25 5203.43,3870.91 4985.91,3870.91 4890,3775 4735,3775 4735,3850 4618,3850 4563,3905
  region: 4925,4625 4850,4625 4850,4760 4965,4760 5010,4805 5106,4805 5106,4685 5055,4685 5030,4710 4956,4710 4925,4679
  region: 4914,5005 4850,5005 4850,5185 5106,5185 5106,5065 4955,5065 4914,5024
  region: 8040,3310 8095,3310 8095,3375 8040,3375 8040,3310
  region: 4964,3540 5203.43,3540 5203.43,3665 5130,3665 5115,3650 5115,3635 5100,3620 5055,3620 5045,3630 4964,3630
  region: 4680,5135 4511,5135 4510,5134 4510,4955 4575,4955 4620,5000 4680,5000
  region: 6710,3860 6710,3745 6720,3735 6720,3655 6765,3655 6765,3860 6710,3860
  region: 8040,3635 8095,3635 8095,3705 8040,3705 8040,3635
  region: 4854,3578 4854,3710 4985,3710 5035,3760 5106,3760 5106,3640 5060,3640 5040,3660 4965,3660 4910,3605 4910,3578
  region: 5115,3375 5185,3375 5185,3306 5115,3306
  region: 5115,4450 5185,4450 5185,4384 5115,4384
  region: 7225,5180 7185,5180 7185,5135 7165,5115 7100,5115 7100,5070 7140,5070 7155,5055 7225,5055
  region: 4510,4932 4510,4613 4680,4613 4680,4765 4625,4765 4625,4785 4948.63,4785 5023.63,4860 5203.43,4860 5203.43,4940 4975,4940 4885,4850 4730,4850 4730,4932
  region: 4964,3206 5000,3170 5203.88,3170 5203.88,3290 5125,3290 5115,3280 5115,3250 5105,3240 5055,3240 5020,3275 5020,3290 4964,3290
  region: 5115,5175 5195,5175 5195,5108 5115,5108
  region: 4964,4240 5202.98,4240 5202.98,4365 5120,4365 5120,4330 5105,4315 5060,4315 5042,4333 4964,4333
  region: 4964,3890 5203.43,3890 5203.43,4015 5130,4015 5115,4000 5115,3985 5105,3975 5055,3975 5038,3992 4964,3992
  region: 4856,3360 4856,3227 4912,3227 4933,3248 4933,3310 5030,3310 5050,3290 5050,3265 5106,3265 5106,3375 5050,3375 5035,3360
  region: 6765,3960 6805,3960 6805,4065 6765,4065 6765,3960
  region: 4855,4065 4855,3930 4913,3930 4913,3968 4970,4025 5030,4025 5060,3995 5060,3990 5106,3990 5106,4100 5030,4100 4995,4065
  region: 7215,5265 7215,5230 7235,5210 7235,5106 7261,5106 7280,5125 7350,5125 7350,5165 7305,5165 7295,5175 7295,5200 7245,5250 7245,5265
  region: 5115,4100 5185,4100 5185,4034 5115,4034
  region: 5115,3750 5185,3750 5185,3684 5115,3684
  region: 4932,4278 4855,4278 4855,4415 4970,4415 5015,4460 5106,4460 5106,4340 5060,4340 5035,4365 4970,4365 4932,4327
  region: 5203.43,4960 5203.43,5090 5120,5090 5120,5065 5095,5040 4964,5040 4964,4960
  region: 3938,3906 4012,3906 4012,3752 3938,3752

## Silkscreen, mask and mechanical layers (free items; w line width, h text height)
Top Overlay:
  lines w6: 6208,3621 6226,3603 6235,3603
  lines w8: 6670,3555 6690,3555 ; 6725,3525 6725,3555 ; 6725,3585 6725,3555 ; 6760,3555 6725,3555 ; 7664.6,3053.56 7664.6,4028.56 ; 7664.6,4228.56 7664.6,5828.56 ; 7694.6,3053.56 7694.6,4028.56 ; 7715,4230 7715,5830 ; 8280,6000 8280,6680 ; 6725,3555 6695,3525 6695,3585 6725,3555
  lines w10: 5160,5250 4465,5250 4465,3035 5710,3035 ; 5530,9890 5700,9890 ; 5710,5250 5880,5250 ; 6235,5250 6680,5250 ; 6565,3035 7045,3035 7045,4075 ; 6823.89,5245 6845,5245 7045,5245 7045,5000 ; 8610,3035 7070,3035 7070,6000 8275,6000 8275,6685 8610,6685 ; 7645,7010 8445,7010 8445,7660 7645,7660 7645,7010
  text "2" at 5707.56,9832.64 h25
  text "10" at 6562.27,9829.64 h25
  text "9" at 6566.77,9730.68 h25
  text "1" at 5715.06,9715.68 h25
  text "Bq76PL536AQ1EVM763" at 7263,9544 h100
  text "TS2+" at 5835,9335 h45
  text "CAUTION" at 3890,9255 h100
  text "HIGH VOLTAGE" at 3762,9144 h100
  text "TIPMM-21246-01" at 7284.73,7565.85 h50 r90
  text "THERMISTORS CIRCUIT 1" at 7710,7190 h40
  text "THERMISTORS" at 7815,7040 h50
  text "10" at 8400.64,6742.19 h37.5
  text "TIPMM-21246-01" at 7238,6035 h50
  text "ISOLATED COMMUNICATIONS INTERFACE" at 7165,5865 h35
  text "COMMS" at 7365,5510 h50
  text "JUMPERS" at 3750,5135 h50
  text "TS2+" at 5550,5000 h45
  text "1" at 3842.2,4989.3 h50
  text "2" at 6969,4980 h37.5
  text "1" at 6731,4977 h37.5
  text "CELL 6+" at 4265,4910 h35
  text "TS2-" at 5550,4890 h45
  text "CELL 6+" at 3912,4788 h35
  text "1" at 8280,4645 h37.5
  text "1" at 8585,4645 h37.5
  text "CELL 5+" at 3912,4638 h35
  text "CELL 4+" at 3913,4493 h35
  text "CELL 3+" at 3914,4345 h35
  text "CELL 2+" at 3914,4196 h35
  text "10" at 7090,4155 h37.5
  text "3.3V" at 7630,4155 h35
  text "9" at 6655,4150 h37.5
  text "H" at 6345,4105 h37.5
  text "5.0V" at 7630,4090 h35
  text "CELL 1+" at 3914,4046 h35
  text "CELL 1-" at 4065,3875 h35
  text "S" at 6330,3860 h37.5
  text "7" at 3837.7,3855.68 h50
  text "9" at 8346.34,3739.9 h37.5
  text "10" at 8518,3739 h37.5
  text "TS1-" at 5368.17,3689.09 h45
  text "TS1+" at 5836.7,3597.68 h45
  text "10" at 6575,3290 h25
  text "2" at 5655,3280 h25
  text "CIRCUIT 1" at 6620,3150 h50
  text "9" at 6590,3090 h25
  text "1" at 5655,3080 h25